# Altium PCB Shield_PCB.PcbDoc
Units mm, origin at the board's own origin, x right, y up, seen from the top; angles counter-clockwise.
Board outline 70.16 x 87.07 mm, 2 copper layers (Top Layer, Bottom Layer); 11 components, 18 nets, 73 pads, 66 vias.
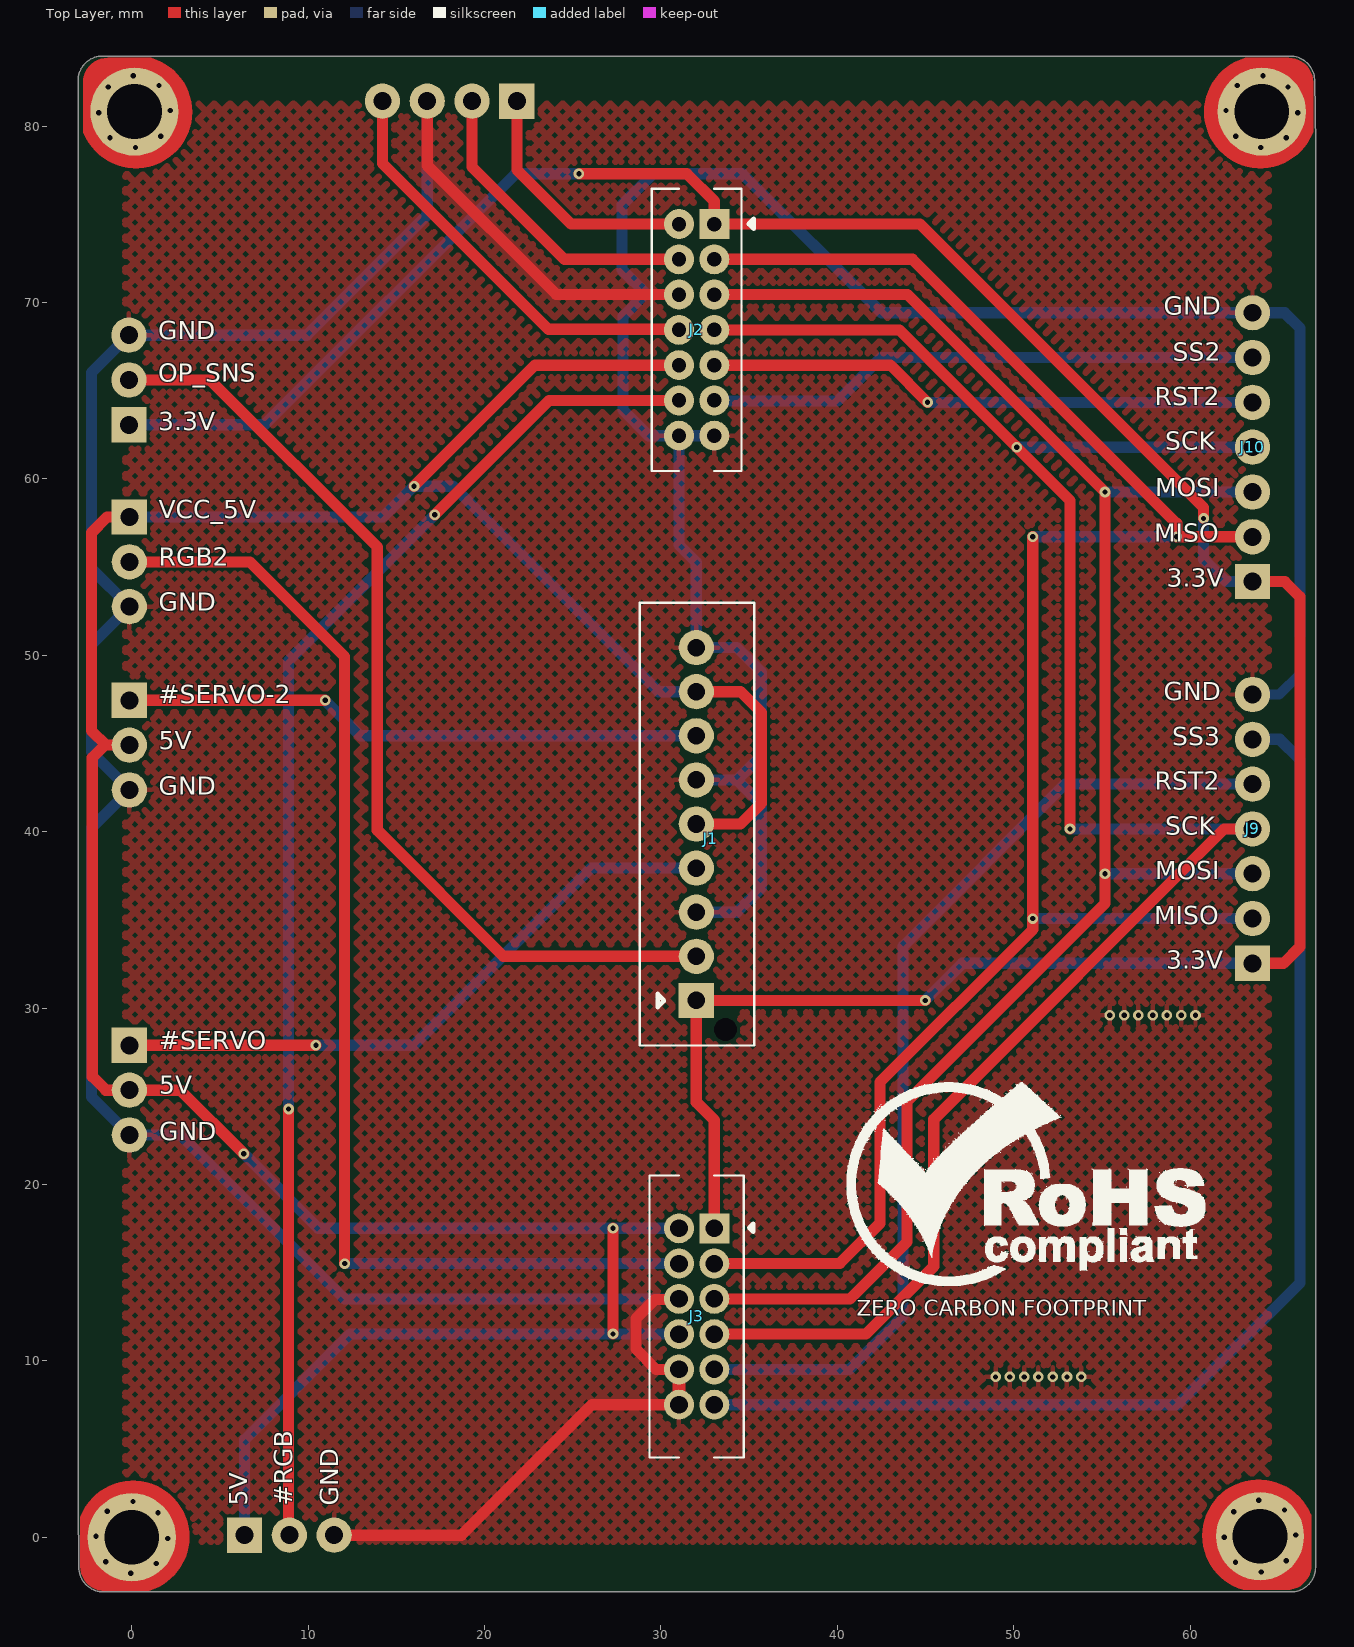
[diagram p0: Top Layer view]
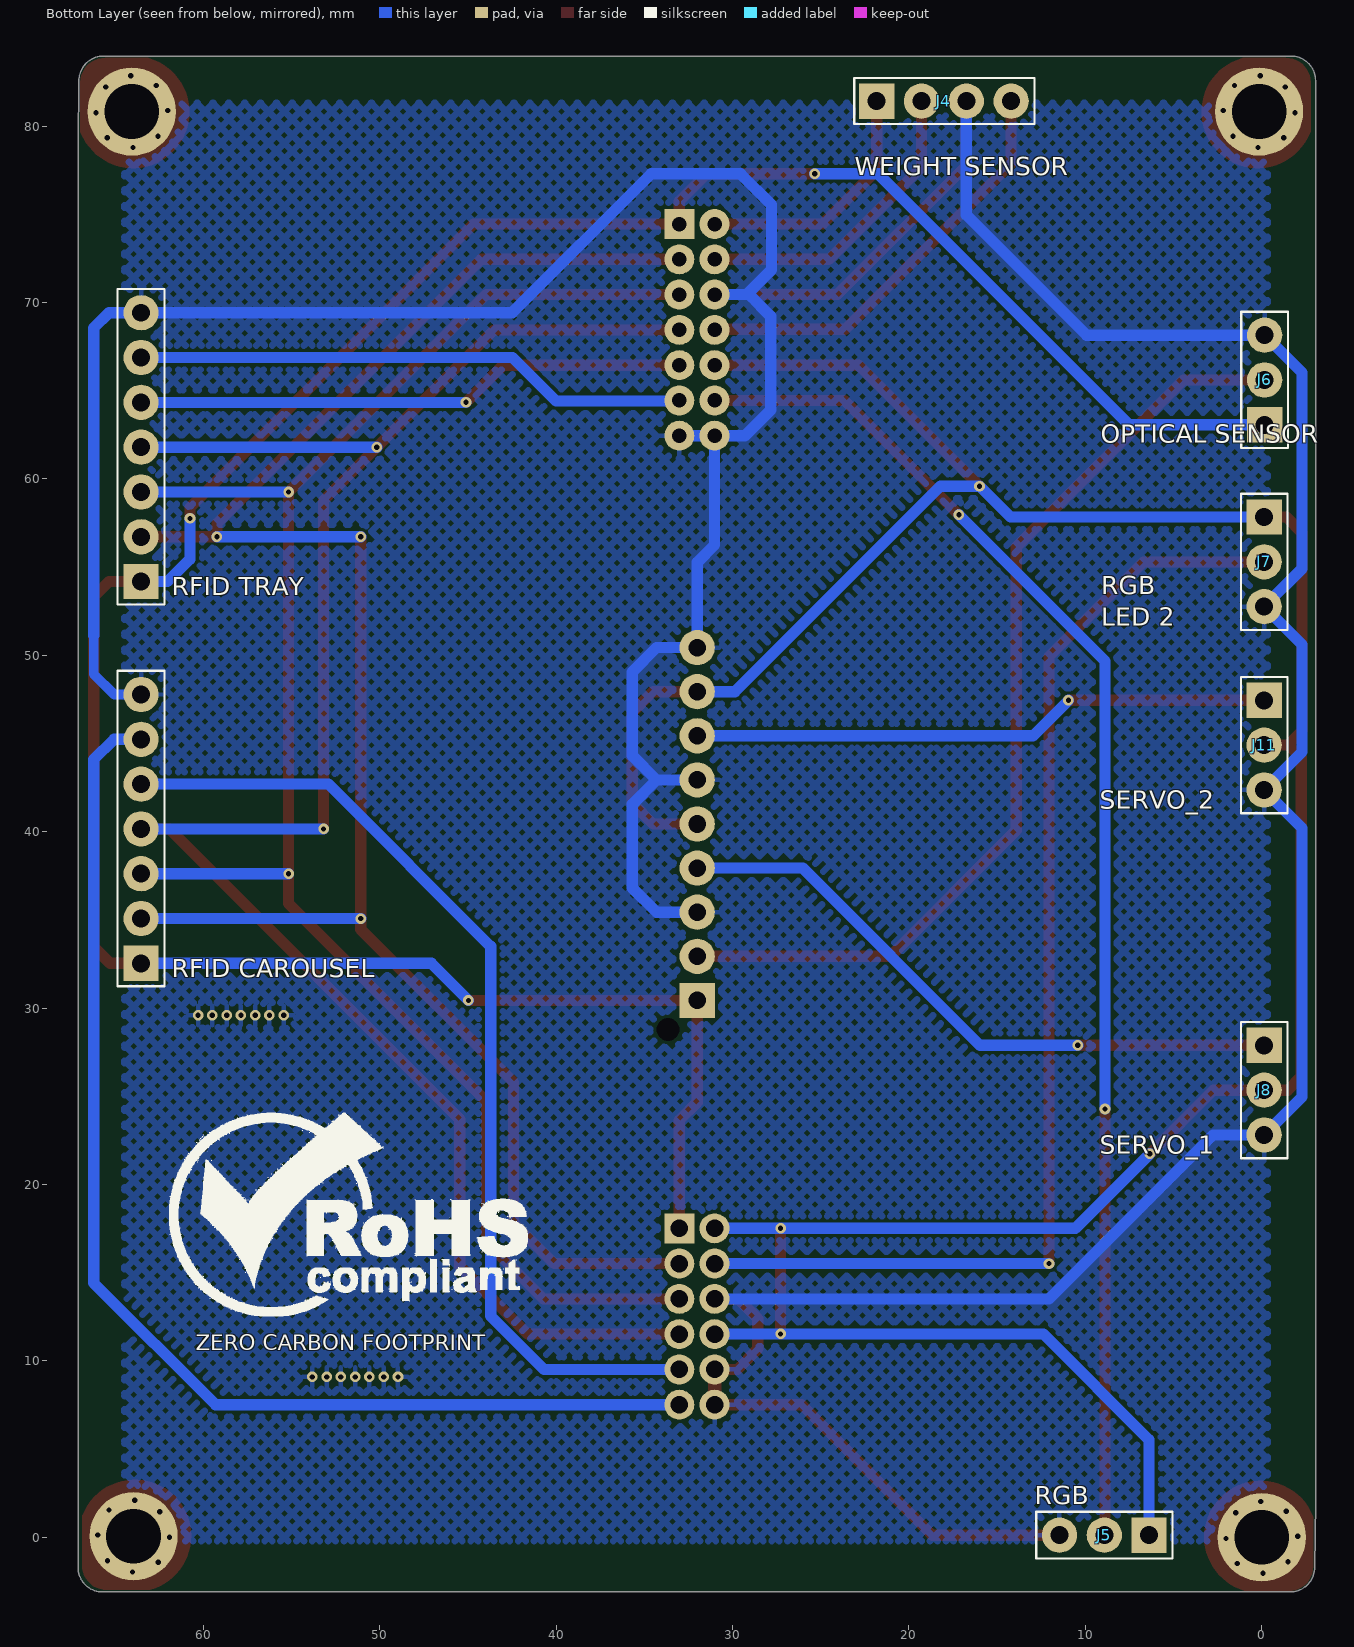
[diagram p1: Bottom Layer view, seen from below]
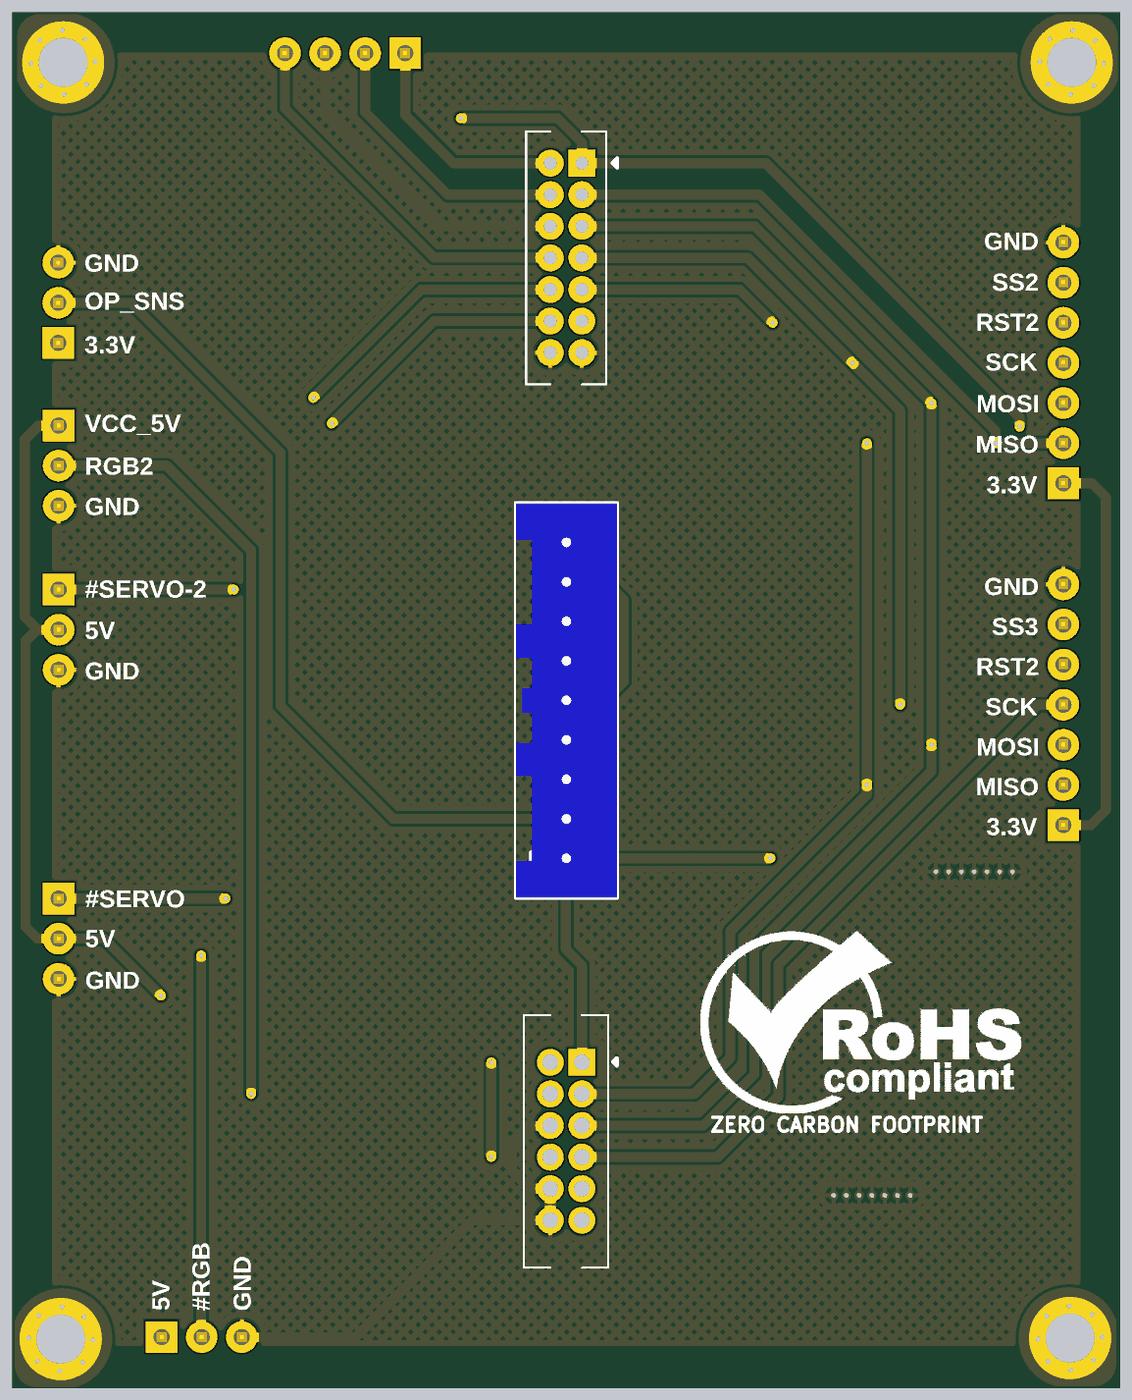
[diagram p2: 3D render of the assembled board from above, using the file's embedded part models]
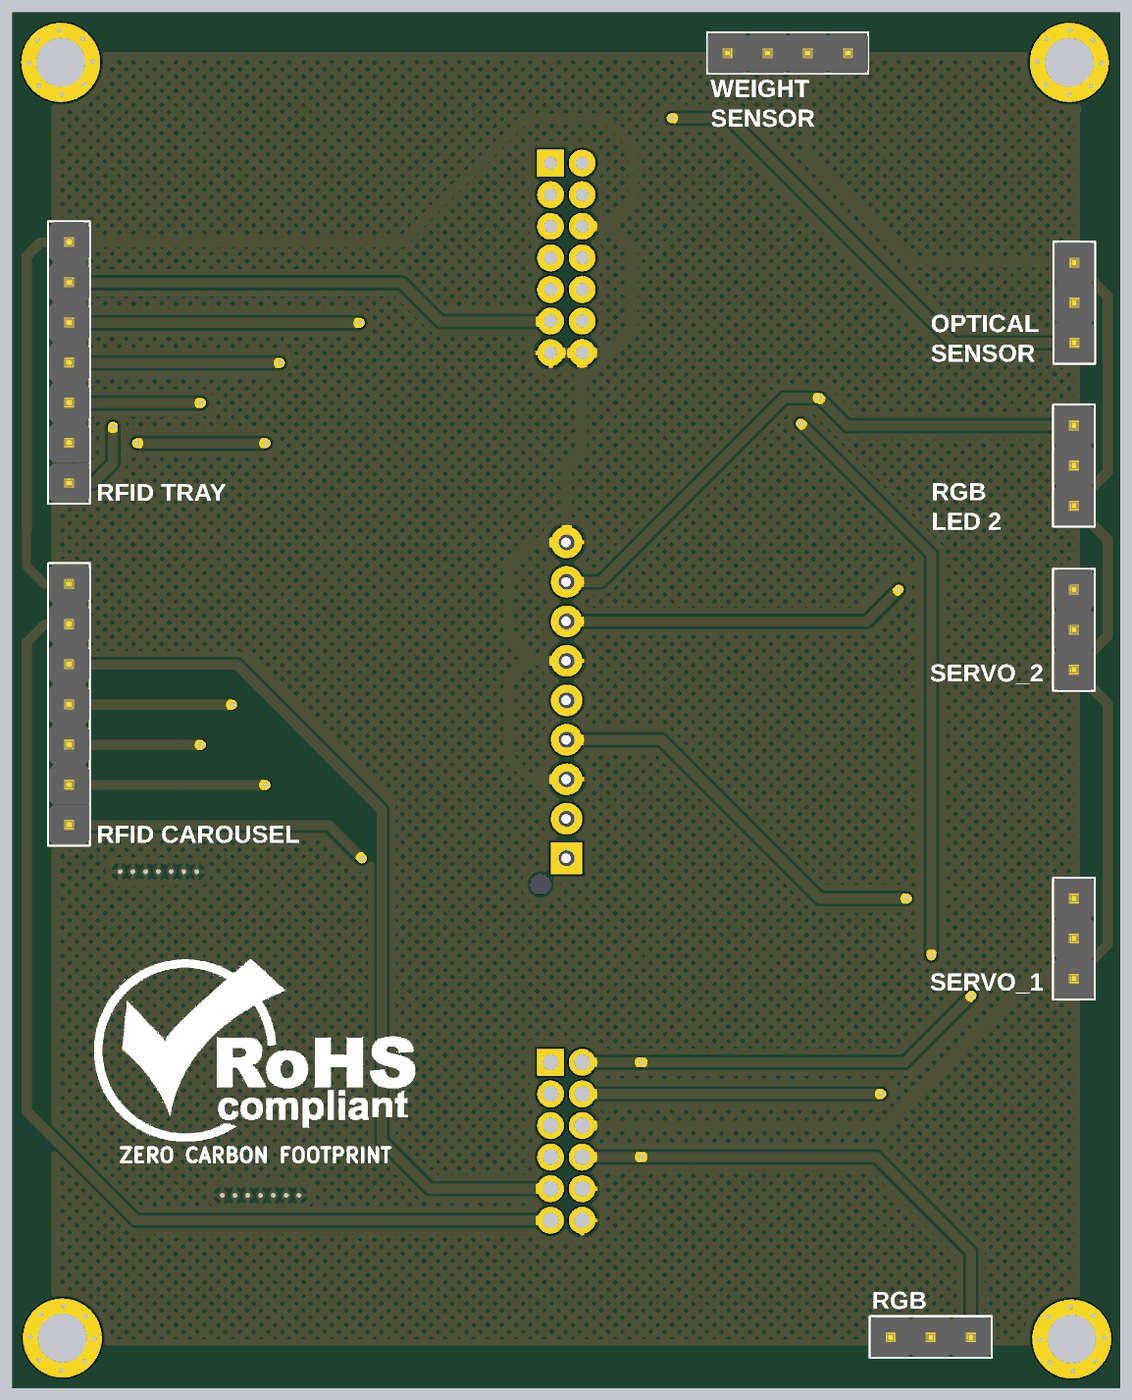
[diagram p3: 3D render of the assembled board from below, using the file's embedded part models]

## Layer stack, top to bottom
Top Solder: solder mask 0.0102, Solder Resist, Dk 3.5
Top Layer: signal copper 0.0356
Dielectric 1: dielectric 0.32, FR-4, Dk 4.8
Bottom Layer: signal copper 0.0356
Bottom Solder: solder mask 0.0102, Solder Resist, Dk 3.5

## Board outline
-2.998,-1.678 -3.048,1.928 cw(c-2.921,1.93) -3.048,1.929 -3.048,1.928 -3.048,1.929 cw(c-2.921,1.93) -3.048,1.93 -3.048,82.575 cw(c-1.651,82.575) -1.651,83.973 65.659,83.973 cw(c65.659,82.575) 67.054,82.648 cw(c66.929,82.626) 67.056,82.628 67.107,78.945 cw(c66.98,78.943) 67.107,78.943 67.107,-1.702 ccw(c66.98,-1.702) 67.107,-1.701 67.107,-1.702 cw(c65.71,-1.702) 65.71,-3.099 cw(c65.71,-2.972) 65.684,-3.097 cw(c65.659,-2.972) 65.659,-3.099 -1.6,-3.099 cw(c-1.6,-1.702) -2.998,-1.702 cw(c-2.87,-1.702) -2.997,-1.689 cw(c-2.87,-1.676)

## Design rules (kind name [scope] priority, off if disabled: settings)
Clearance [All] p1: gap=0.178 ignorepadtopadclearanceinfootprint=FALSE
ComponentClearance [All] p1: gap=0 collisioncheckmode=3 verticalgap=0 showdistances=FALSE
HoleSize [All] p1: absolutevalues=TRUE maxlimit=25.4 minlimit=0.025 maxpercent=80.000 minpercent=20.000
HoleToHoleClearance [All] p1: gap=0 allowstackedmicrovias=TRUE
MinimumSolderMaskSliver [All] p1: minsoldermaskwidth=0
PolygonConnect [All] p1: connectstyle=Relief reliefconductorwidth=0.254 reliefentries=4 polygonreliefangle="90 Angle" airgapwidth=0.254
RoutingVias [All] p1: holewidth=0.3 width=0.6 viastyle="Through Hole" minholewidth=0.3 minwidth=0.6 maxholewidth=0.3 maxwidth=0.6
SilkToSilkClearance [All] p1: silktosilkclearance=0
SilkToSolderMaskClearance [IsPad] p1: minsilkscreentomaskgap=0 clearancetoexposedcopper=TRUE
SolderMaskExpansion [All] p1: expansion=0.102 istentingtop=FALSE
Width [All] p1: maxlimit=1.27 minlimit=0.254 preferedwidth=0.559 minimp=50.000000 maximp=50.000000 favimp=50.000000
24 further rules are at their usual default settings.

## Components (designator, comment, footprint, x,y, rotation, side; value= is the part's Value field where it differs from the comment)
J1 "B09B-XASK-1-A(LF)(SN)" B09B-XASK-1-A(LF)(SN) 32.829,39.771 r270 top locked
J2 "PHD-2*7A" PHD-2*7A 33.02,74.447 r90 top locked
J3 "X2026WV-2x06A-N0SN" X2026WV-2x06A-N0SN 33.02,17.518 r90 top locked
J4 "HDR_M_1X4" HDR_M_1X4 21.829,81.412 r180 bottom locked
J5 "HDR_M_1X3" HDR_M_1X3 8.93,0.123 r0 bottom locked
J6 "HDR_M_1X3" HDR_M_1X3 -0.161,65.608 r90 bottom locked
J7 "HDR_M_1X3" HDR_M_1X3 -0.135,55.296 r270 bottom locked
J8 "HDR_M_1X3" HDR_M_1X3 -0.135,25.349 r270 bottom locked
J9 "HDR_M_1X7" HDR_M_1X7 63.531,32.537 r90 top locked
J10 "HDR_M_1X7" HDR_M_1X7 63.531,54.178 r90 top locked
J11 "HDR_M_1X3" HDR_M_1X3 -0.135,44.907 r270 bottom locked

## Footprints (in the part's own frame and the unit in brackets; to place one, negate y for a bottom-side part, rotate by r counter-clockwise, add the part's x,y. Pads: shape width x height; smd on the part's side, far side on the other; paste and mask are expansions set on the pad)
B09B-XASK-1-A(LF)(SN) [mm]
  rect 2x2 hole 1: 1(9.335,-0.825)
  round 2 hole 1: 2(6.834,-0.825) 3(4.334,-0.825) 4(1.834,-0.825) 5(-0.666,-0.826) 6(-3.166,-0.826) 7(-5.666,-0.826) 8(-8.166,-0.826) 9(-10.666,-0.826)
  round 0 hole 1.3 unplated: MH1(10.986,0.826)
  silkscreen extent -13.21,-4.04 11.89,2.46, body extent -13.16,-3.99 11.84,2.41, height 8.8
HDR_M_1X3 [mm] "2.54mm spacer header"
  rect 2x2 hole 1.02: 1(-2.54,0)
  round 2 hole 1.02: 2(0,0) 3(2.54,0)
  silkscreen extent -3.86,-1.32 3.86,1.32, body extent -3.81,-1.27 3.81,1.27, height 11.93
HDR_M_1X4 [mm] "2.54mm spacer header"
  rect 2x2 hole 1.02: 1(0,0)
  round 2 hole 1.02: 2(2.54,0) 3(5.08,0) 4(7.62,0)
  silkscreen extent -1.27,-1.3 8.94,1.32, body extent -1.25,-1.27 8.92,1.27, height 11.93
HDR_M_1X7 [mm] "2.54mm Board Spacer Pin Header"
  rect 2x2 hole 1.02: 1(0,0)
  round 2 hole 1.02: 2(2.54,0) 3(5.08,0) 4(7.62,0) 5(10.16,0) 6(12.7,0) 7(15.24,0)
  body extent -1.25,-1.27 16.54,1.27, height 2.77
PHD-2*7A [mm]
  rect 1.7x1.7 hole 0.82: 1(0,0)
  round 1.7 hole 0.82: 2(-2,0) 3(-4,0) 4(-6,0) 5(-8,0) 6(-10,0) 7(-12,0) 8(0,2) 9(-2,2) 10(-4,2) 11(-6,2) 12(-8,2) 13(-10,2) 14(-12,2)
  silkscreen extent -14,-2.24 2,3.54
X2026WV-2x06A-N0SN [mm]
  rect 1.7x1.7 hole 1: 1(0,0)
  round 1.7 hole 1: 2(0,2) 3(-2,0) 4(-2,2) 5(-4,0) 6(-4,2) 7(-6,0) 8(-6,2) 9(-8,0) 10(-8,2) 11(-10,0) 12(-10,2)
  silkscreen extent -13,-2.21 3,3.67

## Part data
J1: "CONN HEADER VERT 9POS 2.5MM", Current Rating=3A, Manufacturer=JST, Max Operating Temperature=85°C, Min Operating Temperature=-25°C, Supplier Part Number 1=455-4123-ND, Category=Connectors, Contact Plating=Copper,Tin,Lead, Height=8.8mm, Length=25mm, Manufacturer Part Number=B09B-XASK-1-A(LF)(SN), Number of Poles=9, Pitch=2.5mm, Pricing 1="1=0.50000, 10=0.43900, 100=0.36160, 500=0.31446, 1000=0.25942, 5000=0.22798, 10000=0.21226 (USD)", RoHS=Yes, Shape=Straight, Supplier 1=Digi-Key, Width=6.4mm
J2: "2x7P 2 PHD 2mm 2mm 7 Phosphor bronze Plugin,P=2mm Wire To Board / Wire To Wire Connector ROHS", Manufacturer=BOOMELE, Package=Custom, ComponentLink1Description=LCSC, ComponentLink1URL=https://lcsc.com/product-detail/Wire-To-Board-Wire-To-Wire-span-style-background-color-ff0-Connector-span_BOOMELE-Boom-Precision-Elec-PHD-2-7A_C40745.html, Manufacturer Part No=PHD-2*7A
J3: "2x6P 2 2mm 2mm 6 Brass Plugin,P=2mm Wire To Board / Wire To Wire Connector ROHS", Manufacturer=XKB-Connectivity, Package=Custom, ComponentLink1Description=LCSC, ComponentLink1URL=https://lcsc.com/product-detail/Wire-To-Board-Wire-To-Wire-span-style-background-color-ff0-Connector-span_XKB-Connectivity-X2026WV-2x06A-N0SN_C725844.html, Manufacturer Part No=X2026WV-2x06A-N0SN
J4: "4 POS 2.54mm spacer header", Current Rating=1Amps, Manufacturer=E-SIMPO, ComponentLink1Description=AliE, ComponentLink1URL=c, Pitch=2.54mm
J5 J6 J7 J8 J11: "3 POS 2.54mm spacer header", Current Rating=1Amps, Manufacturer=E-SIMPO, ComponentLink1Description=AliE, ComponentLink1URL=https://www.aliexpress.com/item/32896225776.html?spm=a2g0o.productlist.0.0.64116a18Q9OFX2&algo_pvid=aef74b9f-f029-40ba-a87b-4c3df7d87b26&algo_exp_id=aef74b9f-f029-40ba-a87b-4c3df7d87b26-3&pdp_ext_f=%7B%22sku_id%22%3A%2265850500267%22%7D&pdp_pi=-1%3B2.79%3B-1%3BUSD+3.72%40salePrice%3BUSD%3Bsearch-mainSearch, Pitch=2.54mm
J9 J10: "7 POS 2.54mm Board Spacer Pin", Current Rating=1Amps, Manufacturer=E-SIMPO, ComponentLink1Description=AliE, ComponentLink1URL=https://www.aliexpress.com/item/32896225776.html?spm=a2g0o.productlist.0.0.64116a18Q9OFX2&algo_pvid=aef74b9f-f029-40ba-a87b-4c3df7d87b26&algo_exp_id=aef74b9f-f029-40ba-a87b-4c3df7d87b26-3&pdp_ext_f=%7B%22sku_id%22%3A%2265850500267%22%7D&pdp_pi=-1%3B2.79%3B-1%3BUSD+3.72%40salePrice%3BUSD%3Bsearch-mainSearch, Pitch=2.54mm

## Free pads (board coordinates)
  round 5 hole 3.1: MH1(0.152,80.823) MH2(64.059,80.823) MH3(63.957,0.064) MH4(0,0)

## Via types
v1: diameter 0.6, hole 0.3, Top Layer to Bottom Layer, 34 vias
v2: diameter 0.6, hole 0.3, Top Layer to Bottom Layer, tented both sides, 32 vias

## Nets (pads, with @x,y where several pads share a name; then routed paths per layer and width w, separated by ;. In a path a pad name is that pad's centre, name@x,y a point inside that pad or via, vN(x,y) a via of type N, cw(c..) or ccw(c..) an arc to the next point about the centre after c; other vN are vias at no path point)
#RGB: J2.13 J5.2 | length 77.8
  Top Layer w0.635: v1(8.89,24.282) 8.89,0.163 J5.2 ; v1(17.17,57.963) 23.655,64.447 J2.13
  Bottom Layer w0.635: v1(8.89,24.282) 8.89,49.682 v1(17.17,57.963)
#RGB2: J3.4 J7.2 | length 67.8
  Top Layer w0.635: J7.2 6.706,55.296 12.065,49.936 v1(12.065,15.518)
  Bottom Layer w0.635: v1(12.065,15.518) J3.4
#SERVO: J1.4 J8.1 | length 36.3
  Top Layer w0.635: J8.1 v1(10.439,27.889)
  Bottom Layer w0.635: v1(10.439,27.889) 15.977,27.889 26.024,37.937 J1.4
#SERVO_2: J1.7 J11.1 | length 33
  Top Layer w0.635: J11.1 v1(10.962,47.447)
  Bottom Layer w0.635: v1(10.962,47.447) 12.972,45.437 J1.7
AVDD#: J2.11 J4.4 | length 24.2
  Top Layer w0.254: J2.11@30.989,68.478 J2.11
  Top Layer w0.635: J4.4 14.209,77.891 23.622,68.478 J2.11@30.989,68.478
GND: J1.3 J1.6 J1.9 J2.7 J2.10 J2.14 J3.6 J3.10 J3.12 J4.3 J5.3 J6.3 J7.3 J8.3 J9.7 J10.7 J11.3 | length 287.6
  Top Layer w0.559: J3.6@30.984,13.482 J3.6
  Top Layer w0.635: J5.3 18.69,0.123 26.086,7.518 J3.12 ; J4.3 16.749,77.764 24.066,70.447 J2.10 ; J3.6@30.984,13.482 29.662,13.482 28.575,12.395 28.575,10.668 29.725,9.518 J3.10
  Top Layer w0.762: J3.12 J3.10
  Bottom Layer w0.559: J9.7 65.049,47.777 66.218,48.946 66.218,51.13
  Bottom Layer w0.635: J4.3 16.749,74.966 9.931,68.148 J6.3 -2.286,66.023 -2.286,54.906 J7.3 -2.286,50.605 -2.286,44.518 J11.3 -2.286,40.217 -2.286,24.96 J8.3 2.769,22.809 12.059,13.518 J3.6 ; J2.10 29.197,70.447 ; J1.3 34.304,35.437 35.687,36.819 35.687,41.554 34.304,42.937 ; J1.6 34.304,42.937 ; J2.7 J2.14 ; 66.218,51.13 66.218,68.555 65.354,69.418 J10.7 42.494,69.418 34.62,77.292 29.54,77.292 27.788,75.54 27.788,71.857 29.197,70.447 ; 29.197,70.447 29.071,70.447 27.838,69.215 27.838,63.906 29.297,62.447 J2.14 ; J2.14 31.02,56.254 32.004,55.27 J1.9 34.304,50.437 35.687,49.054 35.687,44.319 34.304,42.937
  other v1: 48.968,9.093 49.777,9.093 50.586,9.093 51.395,9.093 52.204,9.093 53.013,9.093 53.823,9.093 55.445,29.591 56.254,29.591 57.063,29.591 57.872,29.591 58.681,29.591 59.49,29.591 60.3,29.591
IN_NA: J2.9 J4.2 | length 17.6
  Top Layer w0.635: J4.2 19.289,77.688 24.53,72.447 J2.9
IN_PA: J2.8 J4.1 | length 14.4
  Top Layer w0.635: J4.1 21.829,77.51 24.892,74.447 J2.8
MISO: J2.2 J3.3 J9.2 J10.2 | length 110.9
  Top Layer w0.635: J3.3 40.131,15.518 42.418,17.805 42.418,25.806 51.079,34.468 v1(51.079,35.077) v1(51.079,56.718) ; J2.2 44.266,72.447 59.233,57.48 v1(59.233,56.718) J10.2
  Bottom Layer w0.635: v1(51.079,35.077) J9.2 ; v1(51.079,56.718) v1(59.233,56.718)
MOSI: J2.3 J3.5 J9.3 J10.3 | length 102.9
  Top Layer w0.635: J3.5 40.722,13.518 43.942,16.739 43.942,24.714 55.169,35.941 v1(55.169,37.617) v1(55.169,59.258) 43.98,70.447 J2.3
  Bottom Layer w0.635: v1(55.169,37.617) J9.3 ; v1(55.169,59.258) J10.3
OP_SNS: J1.2 J6.2 | length 55.1
  Top Layer w0.635: J6.2 4.445,65.608 13.919,56.134 13.919,40.081 21.063,32.937 J1.2
RST2: J2.5 J10.5 | length 31.4
  Top Layer w0.635: J2.5 43.001,66.447 v1(45.11,64.338)
  Bottom Layer w0.635: v1(45.11,64.338) J10.5
RST3: J3.9 J9.5 | length 56.5
  Bottom Layer w0.635: J3.9 40.684,9.518 43.713,12.548 43.713,33.503 52.908,42.697 J9.5
SCK: J2.4 J3.7 J9.4 J10.4 | length 113.8
  Top Layer w0.635: J3.7 41.617,11.518 45.466,15.367 45.466,23.698 61.925,40.157 J9.4 ; J2.4 43.516,68.447 v1@50.089,61.874 ; v1(50.165,61.798) 53.188,58.776 v1(53.188,40.157)
  Bottom Layer w0.254: J10.4@63.455,61.874 J10.4
  Bottom Layer w0.635: v1(50.165,61.798) J10.4 ; v1(53.188,40.157) J9.4
SS2: J2.6 J10.6 | length 31.5
  Bottom Layer w0.254: J2.6 J2.6@33.053,64.414
  Bottom Layer w0.635: J2.6@33.053,64.414 40.005,64.414 42.469,66.878 J10.6
SS3: J3.11 J9.6 | length 68.9
  Bottom Layer w0.635: J3.11 59.309,7.518 66.218,14.427 66.218,44.094 65.075,45.237 J9.6
VCC_3V3: J1.1 J2.1 J3.1 J6.1 J9.1 J10.1 | length 153.3
  Top Layer w0.635: v1(25.349,77.292) 31.471,77.292 33.02,75.743 J2.1 44.679,74.447 60.757,58.369 v1(60.757,57.76) ; J3.1 33.02,23.647 32.004,24.663 J1.1 v1(44.976,30.437) ; J9.1 65.278,32.537 66.218,33.477 66.218,53.315 65.354,54.178 J10.1
  Bottom Layer w0.635: J6.1 7.518,63.068 21.742,77.292 v1(25.349,77.292) ; v1(44.976,30.437) 47.076,32.537 J9.1 ; v1(60.757,57.76) 60.757,55.448 62.027,54.178 J10.1
VCC_5V: J1.5 J1.8 J2.12 J3.2 J3.8 J5.1 J7.1 J8.2 J11.2 | length 179.8
  Top Layer w0.635: J11.2 -1.473,44.907 ; J7.1 -1.397,57.836 -2.286,56.947 -2.286,45.72 -1.473,44.907 ; J5.1@6.35,0.163 J5.1 ; v1(6.35,21.742) 2.743,25.349 J8.2 -1.473,25.349 -2.235,26.111 -2.235,44.196 -1.524,44.907 -1.473,44.907 ; v1(16.002,59.588) 22.861,66.447 J2.12 ; v1(27.28,11.532) v1(27.28,17.518) ; J1.5 34.511,40.437 35.687,41.612 35.687,46.761 34.511,47.937 J1.8
  Bottom Layer w0.559: J1.8@31.971,47.904 J1.8
  Bottom Layer w0.635: J7.1 14.249,57.836 v1(16.002,59.588) 18.212,59.588 29.863,47.937 J1.8 ; v1(6.35,21.742) 10.574,17.518 v1(27.28,17.518) J3.2 ; J5.1 6.39,5.527 12.382,11.518 J3.8
pads on no net: J1.MH1
copper on no net: | length 1.9
  Bottom Layer w1.016: 0,0 v2@1.313,-1.313
  other v2: -0.064,-2.032 64.021,-1.968 1.392,-1.482 62.565,-1.418 -1.482,-1.392 65.439,-1.328 2.032,-0.064 61.925,0 -2.032,0.064 65.989,0.127 1.482,1.392 62.475,1.455 -1.392,1.482 65.349,1.546 0.064,2.032 63.894,2.096 0.216,78.791 63.995,78.791 -1.239,79.341 65.451,79.341 1.634,79.431 62.577,79.431 -1.88,80.759 66.091,80.759 2.184,80.886 62.027,80.886 -1.329,82.215 65.541,82.215 1.544,82.305 62.667,82.305 0.089,82.855 64.122,82.855

## Polygon pours and split planes (outlines as drawn)
no net on Mechanical 2 (solid): 8.001,-0.533
GND on Top Layer "Polygon_1" (hatched 45Degree grid 0.635 track 0.381, remove dead copper, pour order 0): -0.356,-0.233 ccw(c-0.33,-0.233) -0.33,-0.259 61.9,-0.259 ccw(c61.9,2.281) 64.44,2.281 64.44,81.178 cw(c64.516,81.178) 64.516,81.255 -0.356,81.255 ccw(c-0.356,81.204) -0.406,81.204 -0.406,77.673 ccw(c-0.356,77.673) -0.356,77.622
GND on Bottom Layer "Polygon_2" (hatched 45Degree grid 0.635 track 0.381, remove dead copper, pour order 2): -0.33,-0.182 ccw(c-0.305,-0.182) -0.305,-0.208 61.925,-0.208 ccw(c61.925,2.332) 64.465,2.332 64.465,81.229 cw(c64.541,81.229) 64.541,81.305 -0.33,81.305 ccw(c-0.33,81.255) -0.381,81.255 -0.381,77.724 ccw(c-0.33,77.724) -0.33,77.673

## Other copper
Top Layer:
  region: 66.871,-1.587 66.871,1.197 ccw(c66.743,1.197) 66.836,1.285 ccw(c63.881,0.089) 60.693,0.089 ccw(c63.881,0.089) 63.016,-2.979 ccw(c63.05,-2.856) 63.059,-2.983 ccw(c63.077,-2.857) 63.077,-2.985 65.473,-2.985 ccw(c65.473,-1.587)
  region: -2.913,-1.651 -2.913,1.134 cw(c-2.786,1.134) -2.879,1.221 cw(c0.076,0.025) 3.264,0.025 cw(c0.076,0.025) 0.942,-3.043 cw(c0.907,-2.92) 0.898,-3.047 cw(c0.881,-2.921) 0.881,-3.048 -1.516,-3.048 cw(c-1.516,-1.651)
  region: 66.972,82.474 66.972,79.689 cw(c66.845,79.689) 66.938,79.601 cw(c63.983,80.797) 60.795,80.797 cw(c63.983,80.797) 63.117,83.865 cw(c63.152,83.743) 63.16,83.87 cw(c63.178,83.744) 63.178,83.871 65.575,83.871 cw(c65.575,82.474)
  region: -2.761,82.474 -2.761,79.689 ccw(c-2.634,79.689) -2.726,79.601 ccw(c0.229,80.797) 3.416,80.797 ccw(c0.229,80.797) 1.094,83.865 ccw(c1.059,83.743) 1.051,83.87 ccw(c1.033,83.744) 1.033,83.871 -1.364,83.871 ccw(c-1.364,82.474)

## Silkscreen, mask and mechanical layers (free items; w line width, h text height)
Top Overlay:
  drawing of 3054 lines, arcs and shapes, not listed
  text "GND" at 58.496,68.961 h1.78
  text "GND" at 1.49,67.576 h1.78
  text "SS2" at 59.004,66.37 h1.78
  text "OP_SNS" at 1.498,65.176 h1.78
  text "RST2" at 57.988,63.83 h1.78
  text "3.3V" at 1.504,62.408 h1.78
  text "SCK" at 58.572,61.316 h1.78
  text "MOSI" at 58.014,58.674 h1.78
  text "VCC_5V" at 1.524,57.429 h1.78
  text "MISO" at 57.963,56.109 h1.78
  text "RGB2" at 1.524,54.73 h1.78
  text "3.3V" at 58.66,53.543 h1.78
  text "GND" at 1.524,52.172 h1.78
  text "GND" at 58.504,47.104 h1.78
  text "#SERVO-2" at 1.524,46.939 h1.78
  text "SS3" at 58.986,44.568 h1.78
  text "5V" at 1.524,44.323 h1.78
  text "RST2" at 57.996,42.033 h1.78
  text "GND" at 1.524,41.758 h1.78
  text "SCK" at 58.58,39.497 h1.78
  text "MOSI" at 58.021,36.961 h1.78
  text "MISO" at 57.97,34.425 h1.78
  text "3.3V" at 58.649,31.902 h1.78
  text "#SERVO" at 1.549,27.33 h1.78
  text "5V" at 1.544,24.816 h1.78
  text "GND" at 1.544,22.174 h1.78
  text "ZERO CARBON FOOTPRINT" at 41.097,12.548 h0.89
  text "5V" at 6.883,1.803 h1.78 r90
  text "#RGB" at 9.423,1.778 h1.78 r90
  text "GND" at 12.04,1.778 h1.78 r90
Bottom Overlay:
  drawing of 3054 lines, arcs and shapes, not listed
  text "WEIGHT SENSOR" at 23.089,76.86 h1.78
  text "OPTICAL SENSOR" at 9.144,61.697 h1.78
  text "RFID TRAY" at 61.798,53.061 h1.78
  text "RGB / LED 2" at 9.093,51.333 h1.78
  text "SERVO_2" at 9.195,40.97 h1.78
  text "RFID CAROUSEL" at 61.798,31.42 h1.78
  text "SERVO_1" at 9.195,21.412 h1.78
  text "ZERO CARBON FOOTPRINT" at 60.427,10.617 h0.89
  text "RGB" at 12.867,1.545 h1.78
Mechanical 2:
  lines w0.254: -2.87,-1.702 ccw(c-1.6,-1.702) -1.6,-2.972 ; -2.87,-1.676 -2.921,1.93 -2.921,82.575 cw(c-1.651,82.575) -1.651,83.845 2.54,83.845 65.659,83.845 cw(c65.659,82.575) 66.929,82.575 ; 65.659,-2.972 61.646,-2.972 2.591,-2.972 ; 65.71,-2.972 ccw(c65.71,-1.702) 66.98,-1.702 66.98,1.681 66.98,78.943 66.929,82.626 ; -1.6,-2.972 -1.422,-2.972 ; -1.6,-2.972 -1.422,-2.972 ; -1.422,-2.972 2.591,-2.972 ; -1.422,-2.972 2.591,-2.972

## Dimensions
66.929,82.626 to -2.921,82.575 on Mechanical 1
-1.651,83.845 to -1.422,-2.972 on Mechanical 1